# Altium PCB IOT_Speaker.PcbDoc (part 3 of 4)
Units mm, origin at the board's own origin, x right, y up, seen from the top; angles counter-clockwise.
Board outline 89.7 x 68.14 mm, 2 copper layers (Top Layer, Bottom Layer), stack 1.448 mm thick; 210 components, 131 nets, 623 pads, 336 vias.
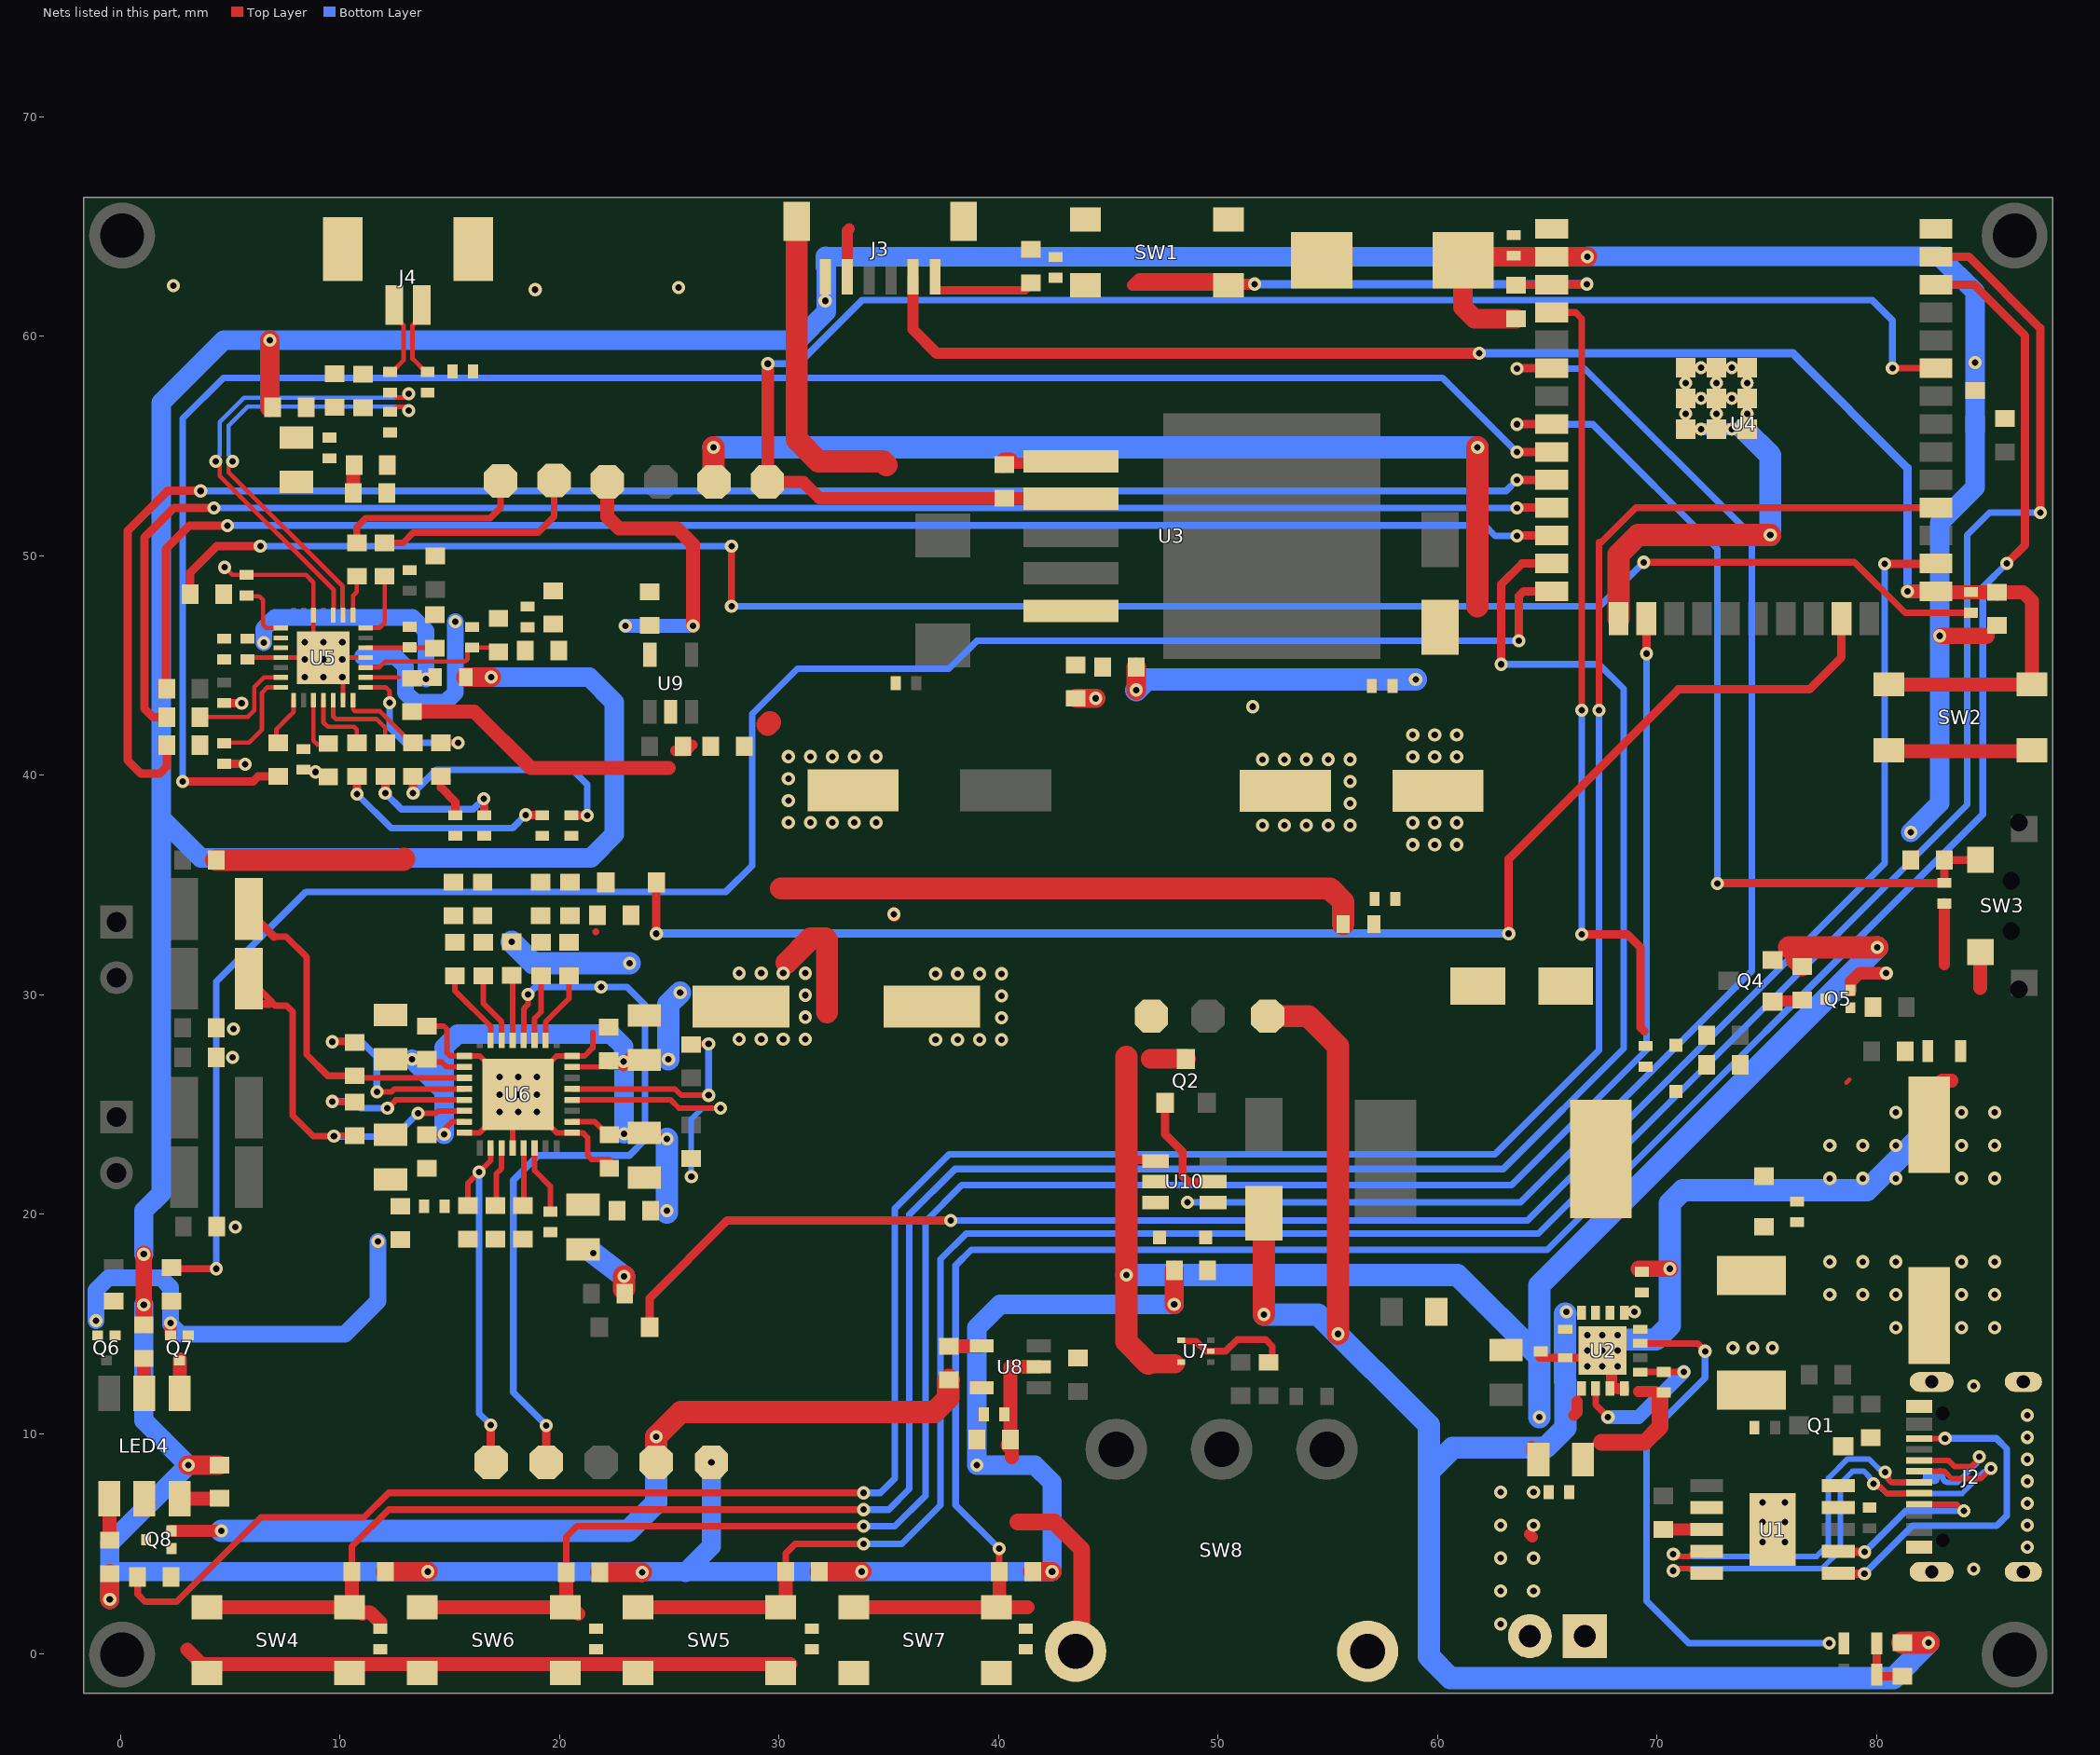
[diagram p2: the nets of this part, all layers, seen from the top]

## Part data (continued)
R38 R39 R40 R41 R55: library part RC0603JR-070RL, "RES 0 OHM JUMPER 1/10W 0603", Case Code (Imperial)=0603, Case Code (Metric)=1608, Manufacturer=Yageo, Max Operating Temperature=155°C, Max Power Dissipation=100mW, Min Operating Temperature=-55°C, Package Quantity=5000, Resistance=0mR, Resistance Tolerance=5%, Resistor Type="Thick Film", Supplier Part Number 1=311-0.0GRCT-ND, Temperature Coefficient=200ppm/°C, Tolerance=1%, Voltage Rating=50V, Case/Package=0603, Category="Chip SMD Resistors", Construction=Rectangular, Contact Plating=Tin,Matte, Depth=0.8mm, Features="Moisture Resistant", Height=0.45mm, Lead Free="Lead Free", Length=1.6mm, Manufacturer Part Number=RC0603JR-070RL, Military Standard=Not, Number of Pins=2, Number of Terminations=2, Packaging="Tape and Reel", Power Rating=100mW, Pricing 1="1=0.10000, 10=0.01700, 25=0.01240, 50=0.00960, 100=0.00700, 250=0.00536, 500=0.00430, 1000=0.00316 (USD)", Radiation Hardening=No, Reach SVHC Compliant="No SVHC", RoHS=Yes, RoHS Compliant=Yes, Series=RC, Size Code=0603, Stock 1=18081776, Supplier 1=Digi-Key, Technology="THICK FILM", Termination=SMD/SMT, Voltage Rating (DC)=50V, Width=0.8mm
R43 R45: library part RC0603FR-072K2L, "RES 2.2K OHM 1% 1/10W 0603", Case Code (Imperial)=0603, Case Code (Metric)=1608, LCSC Part Number=C114662, Manufacturer=Yageo, Max Operating Temperature=155°C, Max Power Dissipation=100mW, Min Operating Temperature=-55°C, Package Quantity=1, Resistance=2.2kR, Resistance Tolerance=1%, Resistor Type="Thick Film", Temperature Coefficient=100ppm/°C, Voltage Rating=50V, Case/Package=0603, Category="Chip SMD Resistors", Construction=Rectangular, Depth=0.8mm, Features="Moisture Resistant", Height=0.022inch, Item Type=Resistor, Lead Free="Lead Free", Length=1.6mm, Manufacturer Part Number=RC0603FR-072K2L, Military Standard=Not, Number of Terminations=2, Packaging="Tape and Reel", Power Rating=100mW, Pricing 1="5000=0.00133, 10000=0.00131, 20000=0.00127 (USD)", RoHS=Yes, RoHS Compliant=Yes, Series=RC, Size Code=0603, Stock 1=733100, Supplier 1=Avnet, Supplier Part Number 1=RC0603FR-072K2L, Termination=SMD/SMT, Tolerance=1%, Width=0.031inch
R44 R52: library part RC0603FR-0710RL, "RES SMD 10 OHM 1% 1/10W 0603", Case Code (Imperial)=0603, Case Code (Metric)=1608, LCSC Part Number=C109318, Manufacturer=Yageo, Max Operating Temperature=155°C, Min Operating Temperature=-55°C, Power Rating=100mW, Supplier Part Number 1=311-10.0HRDKR-ND, Temperature Coefficient=200ppm/°C, Tolerance=1%, Voltage Rating=50V, Case/Package=0603, ComponentLink1Description=http://www.farnell.com/datasheets/1868787.pdf?src-supplier=Element14, ComponentLink1URL=http://www.farnell.com/datasheets/1868787.pdf?src-supplier=Element14, ComponentLink2Description=http://www.yageo.com/documents/recent/PYu-RC0603_51_RoHS_L_4.pdf?src-supplier=Avnet, ComponentLink2URL=http://www.yageo.com/documents/recent/PYu-RC0603_51_RoHS_L_4.pdf?src-supplier=Avnet, ComponentLink3Description=http://documents.rs-components.com/techlib://itc_doclist_GB.htm?stockno=5048984&src-supplier=RSComponents, ComponentLink3URL=http://documents.rs-components.com/techlib://itc_doclist_GB.htm?stockno=5048984&src-supplier=RSComponents, ComponentLink4Description=http://www.yageo.com/documents/recent/PYu-RC0603_51_RoHS_L_4.pdf?src-supplier=Avnet+Europe, ComponentLink4URL=http://www.yageo.com/documents/recent/PYu-RC0603_51_RoHS_L_4.pdf?src-supplier=Avnet+Europe, Composition="Thick Film", Contact Plating=Tin,Matte, Depth=0.8mm, Height=0.45mm, Lead Free="Lead Free", Length=1.6mm, Manufacturer Part Number=RC0603FR-0710RL, Military Standard=Not, Number of Pins=2, Packaging="Tape and Reel", Pricing 1="1=0.1, 10=0.046, 100=0.0187, 1000=0.0084, 2500=0.00729 (USD)", Radiation Hardening=No, REACH SVHC="No SVHC", Resistance=10R, Stock 1=10836596, Supplier 1=Digi-Key, Termination=SMD/SMT, Voltage Rating (DC)=50V, Width=0.8mm
  R52: Item Type=Resistor
R48 R49 R50 R51: library part RC0603FR-075K1L, "RES 5.1K OHM 1% 1/10W 0603", Case Code (Imperial)=0603, Case Code (Metric)=1608, LCSC Part Number=C105580, Manufacturer=Yageo, Max Operating Temperature=155°C, Max Power Dissipation=100mW, Min Operating Temperature=-55°C, Package Quantity=1, Resistance=5.1kR, Resistance Tolerance=1%, Resistor Type="Thick Film", Temperature Coefficient=100ppm/°C, Voltage Rating=50V, Case/Package=0603, Category="Chip SMD Resistors", ComponentLink1Description=https://datasheet.ciiva.com/46395/443971-46395016.pdf?src-supplier=Element14, ComponentLink1URL=https://datasheet.ciiva.com/46395/443971-46395016.pdf?src-supplier=Element14, ComponentLink2Description=https://datasheet.ciiva.com/2454/pyu-r-int-thick-7-2454046.pdf?src-supplier=Digi-Key, ComponentLink2URL=https://datasheet.ciiva.com/2454/pyu-r-int-thick-7-2454046.pdf?src-supplier=Digi-Key, ComponentLink3Description=https://datasheet.ciiva.com/2454/pyu-r-int-thick-7-2454047.pdf?src-supplier=Digi-Key, ComponentLink3URL=https://datasheet.ciiva.com/2454/pyu-r-int-thick-7-2454047.pdf?src-supplier=Digi-Key, ComponentLink4Description=https://datasheet.ciiva.com/2454/pyu-r-int-thick-7-2454045.pdf?src-supplier=Digi-Key, ComponentLink4URL=https://datasheet.ciiva.com/2454/pyu-r-int-thick-7-2454045.pdf?src-supplier=Digi-Key, ComponentLink5Description=https://datasheet.ciiva.com/15189/getdatasheetpartid-326732-15189786.pdf?src-supplier=Verical, ComponentLink5URL=https://datasheet.ciiva.com/15189/getdatasheetpartid-326732-15189786.pdf?src-supplier=Verical, Construction=Rectangular, Depth=0.8mm, Features="Moisture Resistant", Height=0.022inch, Item Type=Resistor, Lead Free="Lead Free", Length=0.063inch, Manufacturer Part Number=RC0603FR-075K1L, Military Standard=Not, Number of Pins=2, Number of Terminations=2, Packaging="Tape and Reel", Power Rating=100mW, Pricing 1="5000=0.00133, 10000=0.00131, 20000=0.00127 (USD)", Reach SVHC Compliant=Yes, RoHS=Yes, RoHS Compliant=Yes, Series=RC, Size Code=0603, Stock 1=100000, Supplier 1=Avnet, Supplier Part Number 1=RC0603FR-075K1L, Termination=SMD/SMT, Tolerance=1%, Voltage Rating (DC)=50V, Width=0.031inch
R53: library part RC0603FR-0773K2L, "RES 73.2K OHM 1% 1/10W 0603", Case Code (Imperial)=0603, Case Code (Metric)=1608, LCSC Part Number=C163420, Manufacturer=Yageo, Max Operating Temperature=155°C, Max Power Dissipation=100mW, Min Operating Temperature=-55°C, Resistor Type="Thick Film", Supplier Part Number 1=8036170, Temperature Coefficient=100ppm/°C, Tolerance=1%, Voltage Rating=50V, Case/Package=0603, Category="Chip SMD Resistors", ComponentLink1Description=https://datasheet.ciiva.com/8888/pyu-rc0603-51-rohs-l-4-8888325.pdf?src-supplier=Avnet, ComponentLink1URL=https://datasheet.ciiva.com/8888/pyu-rc0603-51-rohs-l-4-8888325.pdf?src-supplier=Avnet, Construction=Rectangular, Contact Plating=Tin,Matte, Depth=0.8mm, Features="Moisture Resistant", Height=0.45mm, Item Type=Resistor, Lead Free="Lead Free", Length=1.6mm, Manufacturer Part Number=RC0603FR-0773K2L, Military Standard=Not, Number of Terminations=2, Packaging="Tape and Reel", Power Rating=100mW, Pricing 1="5000=0.00150, 75000=0.00140, 250000=0.00130, 750000=0.00130, 2500000=0.00120 (USD)", RoHS=Yes, RoHS Compliant=Yes, Series=RC, Stock 1=410000, Supplier 1="Future Electronics", Termination=SMD/SMT, Voltage Rating (DC)=50V, Width=0.8mm
SB1 SB2 SB3 SB6 SB7 SB8 SB9 SB10: "Solder Bridge ON", Item Type="Solder Bridge", Manufacturer Part Number="Solder Bridge 0402"
SB4 SB5: "Solder Bridge ON", Manufacturer Part Number="Solder Bridge", Item Type="Solder Bridge"
SW1 SW2: "No NO 50mA 4.5mm 100000 260gf 12V -30℃~+85℃ 4.5mm 4.3mm Black Round Button Brick nogging SPST SMD Tactile Switches ROHS", LCSC Part Number=C381037, Manufacturer="XKB Connectivity", Package=Custom, ComponentLink1Description=LCSC, ComponentLink1URL=https://www.lcsc.com/product-detail/Tactile-Switches_XKB-Connectivity-TS-1109S-C-B_C381037.html, Item Type=Switch, Manufacturer Part Number=TS-1109S-C-B
SW3: "-20℃~+85℃ SMDSplicing Black Rectangle button 50mA Surface Mount SPST 100MΩ 100000 250gf@±50gf 12V SMD Tactile Switches ROHS", LCSC Part Number=C589180, Manufacturer="RI SHENG", ComponentLink1Description=LCSC, ComponentLink1URL=https://www.lcsc.com/product-detail/Tactile-Switches_RI-SHENG-ST-1112RA-P_C589180.html, Manufacturer Part Number=ST-1112RA-P
SW4 SW5 SW6 SW7: "No NO 50mA 4.5mm 100000 160gf 12V -30℃~+85℃ 4.5mm 8mm Black Round Button Brick nogging SPST SMD Tactile Switches ROHS", LCSC Part Number=C480323, Manufacturer="XKB Connectivity", Package=SMD, ComponentLink1Description=LCSC, ComponentLink1URL=https://www.lcsc.com/product-detail/span-style-background-color-ff0-Tactile-span-Switches_XKB-Connectivity-TS-1109S-B-J_C480323.html, Item Type=Switch, Manufacturer Part Number=TS-1109S-B-J
SW8: "Lying 3A SPDT 125V 6.3mm 13.5mm 125V 6.6mm 3A PCPin 10000 Rectangular columnar -40℃~+85℃ Black Plugin Slide Switches ROHS", LCSC Part Number=C319010, Manufacturer="XKB Connectivity", Package=Plugin, ComponentLink1Description="LCSC Part Number", ComponentLink1URL=https://www.lcsc.com/product-detail/Slide-Switches_XKB-Connectivity-SS-12D11L5_C319010.html, Item Type=Switch, Manufacturer Part Number=SS-12D11L5
U1: "USB充电芯片 ESSOP-10 USB ICs ROHS", LCSC Part Number=C970725, Manufacturer="WCH(Jiangsu Qin Heng)", Package=ESSOP-10, ComponentLink1Description=LCSC, ComponentLink1URL=https://www.lcsc.com/product-detail/USB-ICs_WCH-Jiangsu-Qin-Heng-CH224K_C970725.html, Item Type=IC, Manufacturer Part Number=CH224K
U2: "TQFN-16-EP(4x4) Battery Management ICs ROHS", LCSC Part Number=C379389, Manufacturer="TOPPOWER(Nanjing Extension Microelectronics)", Package=TQFN-16-EP(4x4), ComponentLink1Description=LCSC, ComponentLink1URL=https://www.lcsc.com/product-detail/Battery-Management-ICs_TOPPOWER-Nanjing-Extension-Microelectronics-TP5100_C379389.html, Item Type=IC, Manufacturer Part Number=TP5100
U3: "NO boost converterType 1 Boost 60V 5V~40V 5A 220kHz TO-263-5 DC-DC Converters ROHS", Manufacturer=XLSEMI, Manufacturer Part Number=C73018, Package=TO-263-5, ComponentLink1Description=LCSC, ComponentLink1URL=https://www.lcsc.com/product-detail/DC-DC-Converters_XLSEMI-XL6019E1_C73018.html, Item Type=Converter, LCSC Part Number=XL6019E1
U4: "SMD,18x25.5mm WiFi Modules ROHS", LCSC Part Number=C701342, Manufacturer="Espressif Systems", Supplier Part Number 1=356-ESP32WRM32E164PH, Category=Uncategorized, ComponentLink1Description=LCSC, ComponentLink1URL=https://www.lcsc.com/product-detail/WiFi-Modules_Espressif-Systems-ESP32-WROOM-32E-N8_C701342.html, Item Type=Module, Manufacturer Part Number=ESP32-WROOM-32E-N8, Pricing 1="1=3.30000, 10=3.30000, 50=3.30000, 100=3.30000, 1000=3.30000, 10000=3.30000 (USD)", RoHS=No, Stock 1=24616, Supplier 1=Mouser
U5: "QFN-28-EP(4x4) ADC/DAC - Specialized ROHS", LCSC Part Number=C365736, Manufacturer=Everest-semi, Package=QFN-28-EP(4x4), ComponentLink1Description=LCSC, ComponentLink1URL=https://www.lcsc.com/product-detail/ADC-DAC-Specialized_Everest-semi-Everest-Semiconductor-ES8388_C365736.html, Item Type=IC, Manufacturer Part Number=ES8388
U6: "IC AMP AUDIO 15W CLASS D 32UQFN", Case/Package=QFN, LCSC Part Number=C167118, Manufacturer=Diodes, Max Operating Temperature=85°C, Max Output Power=10W, Max Supply Voltage=18V, Min Operating Temperature=-20°C, Min Supply Voltage=8V, Package Quantity=3000, Power Supply Rejection Ratio (PSRR)=65dB, Supplier Part Number 1=7902950, Voltage Gain=32dB, Category="Amplifiers - Audio", ComponentLink1Description=https://datasheet.ciiva.com/24013/pam8006a-247273-24013164.pdf?src-supplier=Mouser, ComponentLink1URL=https://datasheet.ciiva.com/24013/pam8006a-247273-24013164.pdf?src-supplier=Mouser, ComponentLink2Description=https://datasheet.ciiva.com/29896/pam8006a-29896322.pdf?src-supplier=Avnet, ComponentLink2URL=https://datasheet.ciiva.com/29896/pam8006a-29896322.pdf?src-supplier=Avnet, ComponentLink3Description=https://datasheet.ciiva.com/30481/0900766b81268cf3-30481630.pdf?src-supplier=Rs, ComponentLink3URL=https://datasheet.ciiva.com/30481/0900766b81268cf3-30481630.pdf?src-supplier=Rs, Height=0.75mm, Item Type=IC, Lead Free="Lead Free", Length=5mm, Manufacturer Part Number=PAM8006ATR, Mounting Technology="Surface Mount", Packaging="Tape and Reel", Pins=32, Pricing 1="2=2.11500 (GBP)", Radiation Hardening=No, RoHS=Yes, RoHS Compliant=Yes, Series=-, Stock 1=596, Supplier 1=Rs, Width=5mm
U7: "IC SUPERVISOR 1 CHANNEL 5VSOF", Case/Package=VSOF, LCSC Part Number=C509824, Manufacturer=Rohm, Max Operating Temperature=105°C, Max Power Dissipation=210mW, Max Reset Threshold Voltage=6.09V, Max Supply Current=1.98uA, Max Supply Voltage=10V, Min Operating Temperature=-40°C, Min Reset Threshold Voltage=5.91V, Min Supply Voltage=1.2V, Number of Voltages Monitored=1, Operating Supply Current=900nA, Package Quantity=3000, Supplier Part Number 1=BD4860FVE-CT-ND, Threshold Voltage=6V, Accuracy=1%, Category="Voltage Supervisors", ComponentLink1Description=https://datasheet.ciiva.com/1974/bd48xxg-e-1974994.pdf?src-supplier=Digi-Key, ComponentLink1URL=https://datasheet.ciiva.com/1974/bd48xxg-e-1974994.pdf?src-supplier=Digi-Key, ComponentLink2Description=https://datasheet.ciiva.com/8133/bd48xxg-e-8133113.pdf?src-supplier=Avnet, ComponentLink2URL=https://datasheet.ciiva.com/8133/bd48xxg-e-8133113.pdf?src-supplier=Avnet, Item Type=IC, Lead Free="Lead Free", Manufacturer Part Number=BD4860FVE-TR, Mounting Technology="Surface Mount", Number of Monitored Inputs=1, Packaging="Tape and Reel", Pins=5, Pricing 1="1=0.64000, 10=0.54900, 25=0.51200, 100=0.40960, 250=0.38032, 500=0.32182, 1000=0.24868 (USD)", Reset="Active Low", RoHS=Yes, RoHS Compliant=Yes, Series=BD48xxx, Stock 1=5990, Supplier 1=Digi-Key, Type="Simple Reset/Power-On Reset,Voltage Detector", Watchdog Timer=No
U8: "SPX3819 Series 3.3 V 500 mA Fixed Output SMT LDO Regulator - SOT-23-5", LCSC Part Number=C9055, Manufacturer=MaxLinear, Supplier Part Number 1=23R9703, Category="Voltage Regulators - Linear", ComponentLink1Description=LCSC, ComponentLink1URL=https://www.lcsc.com/product-detail/Linear-Voltage-Regulators-LDO_MaxLinear-SPX3819M5-L-3-3-TR_C9055.html, Item Type=IC, Manufacturer Part Number=SPX3819M5-L-3-3/TR, RoHS=Yes, RoHS Compliant=Yes, Supplier 1=Newark
U9: "IC REG LINEAR 3.3V 150MA SOT23-5", LCSC Part Number=C89347, Manufacturer="Texas Instruments", Package=SOT-23-5, Item Type=IC, Manufacturer Part Number=TPS70933DBVR
U10: "IC OR CTRLR SRC SELECT TSOT23-6", Case/Package=SOT-23-6, LCSC Part Number=C521306, Manufacturer="Analog Devices / Linear Technology", Max Operating Temperature=85°C, Min Operating Temperature=-40°C, Operating Supply Current=15uA, Package Quantity=2500, Supplier Part Number 1=LTC4412IS6#TRPBFCT-ND, Category=Uncategorized, ComponentLink1Description=https://datasheet.ciiva.com/1960/1527-1960891.pdf?src-supplier=Digi-Key, ComponentLink1URL=https://datasheet.ciiva.com/1960/1527-1960891.pdf?src-supplier=Digi-Key, Item Type=IC, Length=2.9mm, Manufacturer Part Number=LTC4412IS6#TRPBF, Number of Pins=6, Packaging="Tape and Reel", Pricing 1="1=3.90000, 10=3.50700, 25=3.31520, 100=2.87310, 250=2.72580, 500=2.44584, 1000=2.08500 (USD)", RoHS=Yes, RoHS Compliant=Yes, Series=PowerPath™, Stock 1=2608, Supplier 1=Digi-Key, Turn-Off Delay Time=13us, Turn-On Delay Time=110us

## Free pads (board coordinates)
  round 3 hole 2: MH(0.076,-0.051) MH(0.076,64.592) MH(86.284,-0.051) MH(86.284,64.592)

## Via types
v1: diameter 0.6, hole 0.3, Top Layer to Bottom Layer, 183 vias
v2: diameter 0.6, hole 0.3, Top Layer to Bottom Layer, tented both sides, 153 vias

## Nets (pads, with @x,y where several pads share a name; then routed paths per layer and width w, separated by ;. In a path a pad name is that pad's centre, name@x,y a point inside that pad or via, vN(x,y) a via of type N, cw(c..) or ccw(c..) an arc to the next point about the centre after c; other vN are vias at no path point)
3.3V: C16.1 C17.1 C76.1 C77.1 FB2.1 J3.1 P13.1 R1.2 R17.2 R18.1 R20.1 R24.2 R25.2 R26.2 R27.2 R28.2 R29.2 R30.2 R31.2 R32.2 R42.1 U4.2 U8.5 | length 305.1
  Top Layer w0.381: v2(82.88,46.355) 82.899,46.355 v2@82.939,46.355
  Top Layer w0.559: R18.1@85.319,46.682 85.319,46.723 85.42,46.825 R18.1@85.484,46.825
  Top Layer w0.762: R32.2@1.067,14.961 v2(1.067,15.875) v2(1.067,18.186) ; v2@82.939,46.355 84.991,46.355
  Top Layer w0.889: v2(-0.483,2.457) R30.2@-0.483,3.632 ; v2(3.099,8.585) R31.2@4.521,8.585 ; R42.1@6.807,56.769 v2(6.807,59.833) ; R24.2@12.072,3.727 v2(14.002,3.727) ; FB2.1@15.737,44.475 v2(16.891,44.475) ; R25.2@21.84,3.702 v2(23.771,3.702) ; R26.2@31.837,3.727 v2(33.767,3.727) ; R27.2@41.554,3.727 v2(42.443,3.727) ; v2(48.006,15.9) R1.2@48.006,17.45 ; C16.1@61.366,63.678 C16.1@61.163,63.475 61.163,61.328 61.684,60.808 ; C16.1@61.57,63.627 63.475,63.627 v2(66.827,63.627) ; 61.684,60.795 R17.2@63.576,60.795
  Bottom Layer w0.889: v2(-0.483,2.457) -0.483,3.727 ; v2(1.067,15.875) 1.067,10.617 v2(3.099,8.585) -0.483,5.004 -0.483,3.727 ; v2(1.067,18.186) 1.067,20.168 1.854,20.955 1.854,38.049 ; v2(16.891,44.475) 21.361,44.475 22.504,43.332 22.504,37.313 21.438,36.246 3.658,36.246 1.854,38.049 ; v2(23.771,3.702) v2@23.771,3.727 ; 25.749,3.702 26.924,4.877 v2(26.924,8.712) ; 32.118,63.17 32.118,63.64 32.131,63.652 32.131,63.64 32.144,63.627 v2(66.827,63.627) 66.853,63.652 82.855,63.652 84.48,62.027 v2(84.48,58.801) 84.48,53.111 82.88,51.511 v2(82.88,46.355) 82.88,38.735 v2(81.559,37.414) ; 32.156,63.17 32.156,61.112 30.877,59.833 v2(6.807,59.833) 4.715,59.833 1.854,56.972 1.854,38.049 ; v2(48.006,15.9) 40.081,15.9 39.014,14.834 v2(39.014,8.585) 41.656,8.585 42.443,7.798 v2(42.443,3.727) v2(33.767,3.727) 25.749,3.727 v2@23.771,3.727 ; -0.483,3.727 v2(14.002,3.727) v2@23.771,3.727
  other v2: 32.106,61.62
3.3V##: C28.2 C29.2 C30.2 FB2.2 U5.2 U5.3 U5.16 | length 12.2
  Top Layer w0.203: U5.16@11.179,44.464 12.686,44.464
  Bottom Layer w0.762: v2(6.528,46.05) 6.528,46.685 7.036,47.193 13.31,47.193 13.919,46.584 v2(13.919,44.399)
12V: C3.1 C7.1 C8.1 D2.1 D8.2 F1.2 P1.1 R3.2 U2.1 U2.4 U2.5 U2.16 | length 79
  Top Layer w0.381: D8.2@52.07,20.028 D8.2@52.095,20.054
  Top Layer w1.016: D8.2@52.07,20.028 52.095,20.003 v1(52.095,15.443) ; P1.1@52.267,29.032 54.102,29.032 55.474,27.661 v1(55.474,14.554) ; R3.2@81.178,0.483 v2(82.372,0.483)
  Bottom Layer w0.635: v1@65.822,15.479 v1@65.862,15.519
  Bottom Layer w1.016: v1(52.095,15.443) 54.559,15.443 59.599,10.404 59.599,8.28 ; v1@65.822,15.479 65.811,15.469 65.811,12.401 65.822,12.391 65.822,10.272 64.922,9.373 60.691,9.373 59.599,8.28 ; v2(82.372,0.483) 80.772,-1.118 60.579,-1.118 59.599,-0.137 59.599,8.28
  other v1: 80.872,14.843 83.872,14.843 85.372,14.843 65.862,15.57 68.969,15.57 77.872,16.343 79.372,16.343 80.872,16.343 83.872,16.343 85.372,16.343 77.872,17.843 79.372,17.843 80.872,17.843 83.872,17.843 85.372,17.843
12V#: F1.1 SB1.2
  other v1: 73.457,13.919 74.358,13.919 75.26,13.919
AGND: C23.2 C24.2 C25.2 C26.2 C27.2 C28.1 C29.1 C30.1 C31.2 C32.2 C33.1 C34.1 C37.1 C38.1 C39.2 C40.2 C42.1 C44.1 C45.2 C46.2 C78.2 C79.2 J4.MP1 J4.MP2 R45.2 R55.1 SB5.1 U5.4 U5.13 U5.18 U5.26 U5.29 U9.2 | length 40.9
  Top Layer w0.203: v2(4.75,49.479) 5.093,49.136 C25.2@5.74,49.136 8.446,49.136 8.796,48.786 U5.26@8.796,47.297 U5.29@8.796,45.364 ; C29.1@5.791,45.364 U5.4@7.313,45.364 U5.29@8.796,45.364 ; U5.13@10.146,43.431 U5.29@10.146,45.364 ; U5.18@11.179,45.364 U5.29@10.146,45.364 ; U5.29@8.796,45.364 U5.29@9.246,45.364 10.109,45.364 U5.29@10.146,45.364
  Top Layer w0.381: C27.2@4.724,40.526 4.731,40.519 5.683,40.519 v2(5.69,40.513) ; C26.2@4.724,43.294 v1(5.524,43.294)
  Top Layer w0.508: C78.2@25.298,41.119 25.301,41.122 25.769,41.122 26.034,41.388
  Top Layer w0.635: C44.1@10.617,52.857 10.617,54.102 R45.2@10.643,54.127 ; C28.1@13.284,42.901 16.129,42.901 18.694,40.335 24.982,40.335
  Bottom Layer w0.762: 11.024,45.415 12.533,45.415 12.979,44.969 12.979,43.779 13.426,43.332 14.819,43.332 15.265,43.779 v2(15.265,47.003)
  other v1: 8.89,40.157 8.407,44.475 9.258,44.475 10.109,44.475 8.407,45.275 9.258,45.275 10.109,45.275 8.407,46.076 9.258,46.076 10.109,46.076
  other v2: 18.898,62.128 25.425,62.23 2.413,62.306
AVCC: C61.1 C62.1 R52.2 U6.22 | length 2.9
  Top Layer w0.254: U6.22@18.869,23.019 18.869,21.999 19.583,21.285 19.583,20.396
AVDD: C60.1 U6.5 | length 2.9
  Top Layer w0.254: U6.5@17.869,27.919 C60.1@17.869,30.847
B_EN: R23.2 U4.28 | length 123.9
  Top Layer w0.305: R23.2@0.787,3.48 0.787,2.692 1.118,2.362 2.565,2.362 6.401,6.198 11.1,6.198 12.217,7.315 v2@33.655,7.315 ; v2(67.361,42.977) 67.361,50.622 ; 67.462,50.622 69.037,52.197 U4.28@82.702,52.197
  Bottom Layer w0.305: v2(33.858,7.315) 34.62,7.315 35.281,7.976 35.281,20.264 37.75,22.733 62.612,22.733 67.361,27.482 v2(67.361,42.977)
BAT_ADC: C9.2 D4.2 R10.1 R11.1 U4.4 | length 36.3
  Top Layer w0.305: U4.4@65.202,61.087 66.294,61.087 66.573,60.808 v2(66.573,42.977)
  Top Layer w0.381: v2(66.573,32.766) 68.631,32.766 69.253,32.144 69.253,28.511 69.418,28.346
  Bottom Layer w0.305: v2(66.573,32.766) v2(66.573,42.977)
BATT: C1.1 C2.1 J1.2 P2.1 Q2.3 Q4.2 R9.2 R12.2 U2.9 U7.5 U10.1 | length 72.2
  Top Layer w0.381: 45.999,22.697 46.223,22.474 47.118,22.474 U10.1@47.153,22.438
  Top Layer w0.508: 64.195,5.426 64.313,5.309 ; C1.1@64.287,9.169 C1.1@64.287,9.423 ; 66.218,10.846 66.358,10.986 66.358,11.493
  Top Layer w0.889: 46.825,13.195 48.044,13.195 ; 46.923,27.086 Q2.3@48.539,27.086 ; R12.2@76.307,31.593 R12.2@76.606,31.293
  Top Layer w1.016: 45.822,27.178 v1(45.822,17.247) 45.822,14.199 46.825,13.195 ; 76.022,32.156 v1(80.035,32.156)
  Bottom Layer w1.016: v1(45.822,17.247) 60.909,17.247 64.643,13.513 ; v1(64.643,10.77) 64.643,13.513 ; v1(80.035,32.156) 64.643,16.764 64.643,13.513
  other v1: 62.872,1.343 62.872,2.843 64.372,2.843 62.872,4.343 64.372,4.343 62.872,5.843 64.372,5.843 62.872,7.343 64.372,7.343
BLUE: LED4.2 Q8.3 | length 0.3
  Top Layer w0.635: LED4.2@1.092,7.049 LED4.2@1.275,6.866
BOOST12V_EN: P6.1 R13.2 U3.2 U4.33 | length 76.1
  Top Layer w0.305: v2(80.721,58.547) U4.33@82.702,58.547
  Top Layer w0.381: P6.1@29.472,53.365 P6.1@29.494,53.387
  Top Layer w0.559: P6.1@29.472,53.365 31.115,53.365 31.852,52.629 R13.2@40.259,52.629 ; P6.1@29.494,53.387 v2(29.494,58.754) ; R13.2@40.273,52.615 R13.2@40.259,52.629 ; U3.2@42.875,52.629 R13.2@40.259,52.629 ; U3.2@43.293,52.615 U3.2@43.306,52.602
  Bottom Layer w0.305: v2(29.494,58.754) 30.891,58.754 33.782,61.646 79.807,61.646 80.721,60.731 v2(80.721,58.547)
BOOST_12V: C50.1 C51.1 C52.1 C53.1 C59.1 C66.1 C67.1 C68.1 C69.1 FB1.1 R52.1 U6.10 U6.15 U6.26 U6.31 | length 70.7
  Top Layer w0.254: C50.1@12.308,27.061 v1(13.292,27.061) C51.1@13.959,27.061 14.076,26.944 14.636,26.944 14.861,26.719 U6.10@15.669,26.719 ; v1(14.757,23.647) 14.732,23.622 C53.1@13.959,23.622 13.949,23.622 13.959,23.632 14.513,23.632 15.1,24.219 U6.15@15.669,24.219 ; U6.26@20.569,24.219 21.615,24.219 22.162,23.673 v1(22.936,23.673) ; U6.31@20.569,26.719 22.213,26.719 C69.1@22.25,26.756 ; C69.1@22.259,26.714 v1@22.919,26.714
  Top Layer w0.381: v1@22.919,26.714 v1@23.012,26.807 ; C66.1@23.932,23.602 24.047,23.486 24.85,23.486 v2(24.892,23.444) ; v1@24.943,27.076 v1(24.968,27.076)
  Top Layer w0.762: C68.1@23.216,27.01 C68.1@23.865,27.01
  Top Layer w1.016: 30.099,34.849 55.094,34.849 55.699,34.244 FB1.1@55.699,33.223 ; 30.353,31.471 31.461,32.579 32.122,32.579 ; 32.188,29.217 32.188,32.512
  Bottom Layer w0.889: v1(13.292,27.061) 14.757,25.596 ; v1(14.757,23.647) 14.757,25.596 ; v1(22.936,23.673) 22.936,26.951 v1(22.919,26.968) 22.919,27.652 22.352,28.219 15.367,28.219 14.757,27.61 14.757,25.596
  Bottom Layer w1.016: v2@24.892,20.091 v2(24.892,23.444) ; v1(24.968,27.076) 24.968,29.566 v1(25.502,30.099)
  other v1: 28.194,27.988 29.194,27.988 30.194,27.988 31.194,27.988 31.194,28.988 31.194,29.988 28.194,30.988 29.194,30.988 30.194,30.988 31.194,30.988
  other v2: 24.892,20.168
BOOST_12V#: C10.1 C12.1 D5.1 P5.1 R14.1 SB2.1 | length 57.7
  Top Layer w0.635: P5.1@27.026,53.382 P5.1@27.043,53.365 ; 61.824,47.701 61.874,47.65
  Top Layer w0.889: v1(46.279,43.891) R14.1@46.279,44.933
  Top Layer w1.016: P5.1@27.026,53.382 v2(27.026,54.94) ; 61.824,47.701 v2(61.824,54.94)
  Bottom Layer w0.635: v2(27.026,54.94) v2@27.043,54.94
  Bottom Layer w1.016: v2(27.026,54.94) v2(61.824,54.94) ; v1(46.279,43.891) 46.761,44.374 v1(59.004,44.374)
  other v1: 58.872,36.843 59.872,36.843 60.872,36.843 58.872,37.843 59.872,37.843 60.872,37.843 58.872,40.843 59.872,40.843 60.872,40.843 58.872,41.843 59.872,41.843 60.872,41.843
BSLN: C47.2 U6.12 | length 9
  Top Layer w0.254: C47.2@10.643,27.864 C47.2@10.668,27.838 ; v2(11.684,25.578) 12.351,25.578 12.492,25.719 U6.12@15.669,25.719
  Top Layer w0.305: v2(9.652,27.864) C47.2@10.643,27.864
  Bottom Layer w0.305: v2(9.652,27.864) 9.677,27.889 10.973,27.889 11.684,27.178 v2(11.684,25.578)
BSLP: C49.2 U6.13 | length 7.3
  Top Layer w0.254: v2(12.167,24.841) 12.544,25.219 U6.13@15.669,25.219
  Top Layer w0.305: v2(9.652,25.146) 9.665,25.133 C49.2@10.655,25.133
  Top Layer w0.381: C49.2@10.655,25.133 C49.2@10.668,25.121
  Bottom Layer w0.305: v2(9.652,25.146) 10.643,25.146 10.947,24.841 v2(12.167,24.841)
BSRN: C70.2 U6.29 | length 9.5
  Top Layer w0.254: U6.29@20.569,25.719 25.259,25.719 25.552,25.425 v2(26.797,25.425)
  Top Layer w0.305: C70.2@26.022,27.775 v2@26.784,27.775
  Top Layer w0.381: C70.2@26.01,27.788 C70.2@26.022,27.775 ; v2@26.784,27.775 v2(26.797,27.762)
  Bottom Layer w0.305: v2(26.797,25.425) v2(26.797,27.762)
BSRP: C72.2 U6.28 | length 11.2
  Top Layer w0.254: U6.28@20.569,25.219 25.073,25.219 25.451,24.841 v2(27.33,24.841)
  Bottom Layer w0.254: v2@26.01,21.615 26.01,24.333 26.518,24.841 v2(27.33,24.841)
  other v2: 26.01,21.717
BUTTON_1: C19.1 R24.1 SW4.1 SW4.2 U4.13 | length 114.7
  Top Layer w0.305: R24.1@10.548,3.727 10.548,4.884 12.217,6.553 v2@33.655,6.553
  Top Layer w0.381: v2(62.89,45.06) 62.89,48.692 63.856,49.657 U4.13@65.202,49.657
  Top Layer w0.635: SW4.1@3.938,2.11 SW4.2@10.438,2.11 10.671,1.877 SW4.2@10.95,1.877 ; R24.1@10.548,3.727 10.548,2.279 SW4.2@10.95,1.877 ; SW4.2@11.024,1.803 SW4.2@10.95,1.877 ; 11.836,1.416 11.376,1.877 SW4.2@10.95,1.877
  Bottom Layer w0.305: v2(33.858,6.553) 35.001,6.553 35.941,7.493 35.941,19.99 38.023,22.073 62.992,22.073 68.478,27.559 68.478,43.942 67.361,45.06 v2(62.89,45.06)
BUTTON_2: C21.1 R25.1 SW6.1 SW6.2 U4.16 | length 95.4
  Top Layer w0.305: R25.1@20.316,3.702 20.316,5.305 20.803,5.791 v2@33.655,5.791
  Top Layer w0.381: v2@69.512,45.563 U4.16@69.512,47.137
  Top Layer w0.635: SW6.1@13.76,2.11 SW6.2@20.26,2.11 ; R25.1@20.316,3.702 20.316,2.341 SW6.2@20.853,1.803
  Bottom Layer w0.305: v2(33.858,5.791) 35.281,5.791 36.678,7.188 36.678,19.685 38.329,21.336 63.373,21.336 69.525,27.488 v2(69.525,45.55)
BUTTON_3: C20.1 R26.1 SW5.1 SW5.2 U4.37 | length 113.9
  Top Layer w0.305: R26.1@30.313,3.727 30.313,4.557 30.745,4.989 v2@33.655,4.989
  Top Layer w0.381: U4.37@82.702,63.627 84.201,63.627 87.452,60.376 v2(87.452,51.968)
  Top Layer w0.635: SW5.1@23.581,2.11 SW5.2@30.081,2.11 30.313,2.342 R26.1@30.313,3.727
  Bottom Layer w0.305: v2(33.858,4.989) 35.596,4.989 37.363,6.756 37.363,17.958 38.532,19.126 64.592,19.126 84.125,38.659 84.125,50.952 85.141,51.968 v2(87.452,51.968)
BUTTON_4: C22.1 R27.1 SW7.1 SW7.2 U4.36 | length 107.2
  Top Layer w0.305: R27.1@40.03,3.727 v2(40.03,4.775)
  Top Layer w0.381: U4.36@82.702,62.357 84.43,62.357 86.766,60.02 86.766,50.495 v2(85.928,49.657)
  Top Layer w0.635: SW7.1@33.402,2.11 SW7.2@39.902,2.11 ; R27.1@40.043,3.664 40.043,2.251 SW7.2@39.902,2.11 ; 41.337,2.11 SW7.2@39.902,2.11
  Bottom Layer w0.305: v2(40.03,4.775) 38.049,6.756 38.049,17.678 38.76,18.39 64.999,18.39 84.836,38.227 84.836,48.565 v2(85.928,49.657)
CC1: J2.A5 U1.7 | length 8.7
  Top Layer w0.254: J2.A5@81.937,6.796 83.651,6.796 83.944,6.502 v2(83.972,6.502)
  Top Layer w0.381: U1.7@78.263,4.645 78.287,4.621 v2(79.453,4.621)
  Bottom Layer w0.305: v2(79.453,4.621) 81.334,6.502 v2(83.972,6.502)
CC2: J2.B5 U1.6 | length 16
  Top Layer w0.254: J2.B5@81.937,9.796 v2(83.117,9.796)
  Top Layer w0.381: U1.6@78.263,3.645 78.281,3.627 v2(79.447,3.627)
  Bottom Layer w0.305: v2(79.447,3.627) 81.636,5.817 85.471,5.817 85.928,6.274 85.928,9.322 85.454,9.796 v2(83.117,9.796)
CFG3: R4.1 U1.3 | length 2.1
  Top Layer w0.559: R4.1@70.231,5.588 R4.1@70.288,5.645 U1.3@72.263,5.645
CHRG: LED1.2 U2.15 | length 24.7
  Top Layer w0.305: U2.15@69.239,14.121 71.861,14.121 72.187,13.795 v2(72.187,13.767)
  Bottom Layer w0.305: v2(72.187,13.767) 72.187,12.548 69.52,9.881 69.52,2.388 71.441,0.467 v1(77.835,0.467)
CHRG_CHK: D1.2 R1.1 U4.6 U10.4 | length 65.3
  Top Layer w0.381: v2@63.628,58.547 U4.6@65.202,58.547
  Bottom Layer w0.305: v2(48.616,20.549) 63.779,20.549 74.32,31.09 74.32,50.917 66.703,58.534 v2(63.615,58.534)
CODEC_3V3: C45.1 C46.1 C79.1 P14.1 R44.1 U9.5 | length 12.8
  Top Layer w0.635: P14.1@22.183,53.365 22.183,51.782 22.708,51.257 25.349,51.257 26.086,50.521 v2(26.086,46.812)
  Bottom Layer w0.635: v2(23.012,46.812) v2(26.086,46.812)
CODEC_3V3#: C39.1 C40.1 R44.2 U5.17 | length 6.4
  Top Layer w0.203: U5.17@11.179,44.914 11.793,44.914 12.065,45.187 15.692,45.187 15.811,45.306 15.811,45.695 15.918,45.801 16.007,45.801 C40.1@16.027,45.822 C39.1@16.961,45.822
CS_CELL: C4.2 U2.10 U2.13 | length 7.8
  Top Layer w0.305: U2.10@67.205,12.071 67.205,11.332 v2(67.767,10.77) ; U2.13@69.239,12.821 C4.2@70.301,12.821 ; C4.2@70.304,12.825 C4.2@70.304,12.825 71.22,12.826 v2(71.222,12.827)
  Bottom Layer w0.635: v2(67.767,10.77) 69.164,10.77 v2(71.222,12.827)
D_N: J2.A7 J2.B7 U1.5 | length 26.6
  Top Layer w0.254: v2(70.739,3.769) 70.836,3.866 71.491,3.866 71.539,3.818 72.09,3.818 U1.5@72.263,3.645 ; v2(79.859,7.723) 79.953,7.723 80.091,7.585 80.176,7.585 80.471,7.289 81.096,7.289 81.102,7.296 J2.B7@81.937,7.296 ; J2.A7@81.937,8.296 83.093,8.296 83.428,7.961 84.745,7.961 v2(85.217,8.433)
  Bottom Layer w0.254: v2(70.739,3.769) 70.805,3.835 71.03,3.835 71.061,3.866 77.503,3.866 78.359,4.722 78.359,7.747 78.914,8.302 79.416,8.302 79.7,8.019 79.7,7.976 79.859,7.817 v2(79.859,7.723) 79.953,7.723 80.094,7.582 80.173,7.582 80.471,7.284 83.896,7.284 84.903,8.292 84.982,8.292 85.123,8.433 v2(85.217,8.433)
D_P: J2.A6 J2.B6 U1.4 | length 26.6
  Top Layer w0.254: v2(70.739,4.522) 70.836,4.425 71.491,4.425 71.539,4.472 72.09,4.472 U1.4@72.263,4.645 ; v2(80.391,8.255) 80.391,8.161 80.529,8.023 80.529,7.938 80.678,7.789 80.889,7.789 80.895,7.796 J2.A6@81.937,7.796 ; J2.B6@81.937,8.796 83.269,8.796 83.545,8.52 84.334,8.52 84.685,8.871 v2(84.685,8.965)
  Bottom Layer w0.254: v2(70.739,4.522) 70.805,4.455 71.03,4.455 71.061,4.425 77.272,4.425 77.8,4.953 77.8,7.978 78.683,8.861 79.648,8.861 80.095,8.414 80.138,8.414 80.297,8.255 v2(80.391,8.255) 80.391,8.161 80.532,8.02 80.532,7.941 80.681,7.792 81.255,7.792 81.991,7.792 ccw(c81.991,8.046) 82.245,8.046 82.245,8.104 cw(c82.372,8.104) 82.499,8.104 82.499,7.97 ccw(c82.626,7.97) 82.753,7.97 82.753,8.169 cw(c82.88,8.169) 83.007,8.169 83.007,8.046 ccw(c83.261,8.046) 83.261,7.792 83.642,7.792 83.685,7.792 84.544,8.651 84.544,8.73 84.685,8.871 v2(84.685,8.965)
DAC_L+: R40.1 SB8.1 | length 6.5
  Top Layer w0.381: v2(12.065,39.192) R40.1@12.065,39.954 ; v2(16.561,38.938) 16.568,38.931 16.568,38.193 SB8.1@16.575,38.186
  Bottom Layer w0.305: v2(12.065,39.192) 12.802,38.456 16.078,38.456 v2(16.561,38.938)
DAC_L-: R38.1 SB9.1 | length 2.4
  Top Layer w0.381: R38.1@14.859,39.764 14.668,39.954 R38.1@14.605,39.954 14.605,39.446 15.254,38.797 SB9.1@15.254,38.186
DAC_R+: R41.1 SB7.1 | length 10.1
  Top Layer w0.381: v2(10.782,39.154) R41.1@10.782,39.954 ; v2(18.466,38.202) 18.475,38.192 19.211,38.192 SB7.1@19.217,38.186
  Bottom Layer w0.305: v2(10.782,39.154) 12.344,37.592 17.856,37.592 v2(18.466,38.202)
DAC_R-: R39.1 SB6.1 | length 11.6
  Top Layer w0.381: v2(13.335,39.192) R39.1@13.335,39.954 ; SB6.1@20.538,38.186 20.543,38.181 21.255,38.181 v2(21.26,38.176)
  Bottom Layer w0.305: v2(13.335,39.192) 14.402,40.259 20.599,40.259 21.26,39.599 v2(21.26,38.176)
DACVREF: C31.1 C32.1 U5.19 | length 3.2
  Top Layer w0.203: U5.19@11.179,45.814 13.163,45.814 C32.1@13.183,45.834 13.203,45.814 C31.1@14.326,45.814
EN: C14.2 C15.2 J3.6 R17.1 SW1.3 SW1.4 U4.3 | length 33.1
  Top Layer w0.381: J3.6@37.111,62.161 37.169,62.103 41.212,62.103 41.478,62.37 C14.2@41.478,62.433 ; R17.1@63.576,62.332 63.589,62.344 65.19,62.344 U4.3@65.215,62.37 ; U4.3@65.228,62.382 v2(66.802,62.382)
  Top Layer w0.508: SW1.4@50.469,62.332 46.114,62.332 46.419,62.636 50.469,62.636 50.74,62.365 51.646,62.365 v2(51.664,62.382)
  Bottom Layer w0.381: v2(51.664,62.382) v2(66.802,62.382)
ERASE_BUT: C18.1 R20.2 SW3.1 U4.8 | length 41.3
  Top Layer w0.381: v2@63.628,56.007 U4.8@65.202,56.007 ; v2(72.746,35.077) 72.771,35.103 C18.1@83.083,35.103 ; C18.1@83.083,35.141 R20.2@83.083,36.144 84.721,36.144 SW3.1@84.731,36.154
  Bottom Layer w0.305: v2(63.615,55.994) 67.069,55.994 72.746,50.317 v2(72.746,35.077)
FB_BOOST12V: R14.2 R15.2 U3.5
G_EN: R21.2 U4.14 | length 88.6
  Top Layer w0.305: R21.2@2.337,17.526 v2(4.369,17.526)
  Top Layer w0.381: v2(63.703,46.126) 63.703,48.164 63.926,48.387 U4.14@65.202,48.387
  Bottom Layer w0.305: v2(4.369,17.526) 4.369,30.607 8.458,34.696 27.584,34.696 28.778,35.89 28.778,42.799 30.836,44.856 37.744,44.856 39.014,46.126 v2(63.703,46.126)
GND: C1.2 C2.2 C3.2 C4.1 C5.2 C6.2 C7.2 C8.2 C9.1 C10.2 C11.2 C12.2 C13.2 C14.1 C15.1 C16.2 C17.2 C18.2 C19.2 C20.2 C21.2 C22.2 C48.1 C50.2 C51.2 C52.2 C53.2 C54.1 C59.2 C60.2 C61.2 C62.2 C63.2 C64.2 C65.1 C66.2 C67.2 C68.2 C69.2 C71.1 C73.2 C74.2 C75.2 C76.2 C77.2 C80.1 C81.2 D1.1 D2.2 D3.2 D4.1 J1.1 J2.A1/B12 J2.B1/A12 J2.S1 J2.S2 J2.S3 J2.S4 J3.2 J3.MP1 J3.MP2 LED3.2 P3.1 Q5.2 Q6.2 Q7.2 Q8.2 R11.2 R13.1 R15.1 R46.2 R47.1 R53.1 R55.2 SW1.1 SW1.2 SW2.3 SW2.4 SW3.2 SW4.3 SW4.4 SW5.3 SW5.4 SW6.3 SW6.4 SW7.3 SW7.4 SW8.4 SW8.5 U1.2 U1.9 U1.11 U2.7 U2.11 U2.12 U2.17 U3.1 U4.1 U4.15 U4.38 U4.39 U4.39_10 U4.39_11 U4.39_12 U4.39_13 U4.39_14 U4.39_15 U4.39_16 U4.39_17 U4.39_18 U4.39_19 U4.39_20 U4.39_21 U4.40 U4.41 U4.42 U4.43 U4.44 U4.45 U4.46 U4.47 U6.9 U6.16 U6.20 U6.25 U6.32 U6.33 U7.2 U7.4 U8.2 U10.2 U10.3 | length 236.8
  Top Layer w0.203: Q8.2@2.328,5.582 Q8.2@2.331,5.585 ; v1@4.594,5.585 v1(4.597,5.588) ; 78.619,26 78.759,26.141
  Top Layer w0.254: C51.2@13.969,28.575 14.736,28.575 14.884,28.426 14.884,27.368 15.033,27.219 U6.9@15.669,27.219 16.369,27.219 U6.33@18.119,25.469 ; U6.16@15.669,23.719 16.369,23.719 U6.33@18.119,25.469 ; U6.20@17.869,23.019 U6.33@17.869,24.257 ; 21.514,28.286 21.514,27.584 21.148,27.219 U6.32@20.569,27.219 19.869,27.219 U6.33@18.119,25.469 ; 22.276,22.504 21.463,22.504 21.285,22.682 21.285,23.495 21.061,23.719 U6.25@20.569,23.719 19.869,23.719 U6.33@18.119,25.469
  Top Layer w0.305: U7.4@48.463,14.237 48.482,14.218 49.002,14.218 49.454,13.767 U7.2@49.672,13.767 50.343,13.767 50.876,14.3 52.172,14.3 52.476,13.995 C74.2@52.476,13.233
  Top Layer w0.381: C48.1@4.369,36.144 C48.1@4.559,36.335 ; 64.653,13.471 U2.7@65.822,13.471 67.189,13.471 U2.17@67.514,13.796
  Top Layer w0.508: J3.2@33.109,62.713 33.109,64.809 33.198,64.897 ; R13.1@40.259,54.153 40.333,54.227 43.232,54.227 U3.1@43.306,54.302 ; R15.1@43.523,43.51 R15.1@43.536,43.523 ; U2.17@67.516,13.795 U2.17@67.855,13.455 ; U2.11@67.931,12.071 U2.17@67.931,13.455 ; 68.212,12.052 U2.12@68.389,12.052 ; U2.12@68.478,11.963 U2.12@68.389,12.052 ; U2.12@68.478,12.052 U2.12@68.389,12.052 ; 69.15,11.938 69.926,11.938 C4.1@70.129,11.735 ; 83.083,31.369 C18.2@83.083,34.163
  Top Layer w0.559: Q7.2@2.292,14.494 v1(2.292,15.056) ; Q8.2@2.331,5.585 v1@4.594,5.585 ; v2(11.735,18.771) v2@11.76,18.745 ; v1(35.23,33.68) 35.255,33.655 v1@35.255,33.604 ; R15.1@43.536,43.523 R15.1@43.548,43.51 ; Q5.2@78.816,30.213 78.816,30.582 79.223,30.988 v1(80.442,30.988)
  Top Layer w0.635: 3.061,0.165 3.721,-0.495 SW4.4@3.938,-0.495 ; SW4.4@3.938,-0.89 SW4.4@3.938,-0.495 ; SW5.3@30.531,-0.495 SW4.4@3.938,-0.495 ; 40.538,13.056 C76.2@40.538,9.754 40.538,9.576 40.602,9.512 40.602,8.937 ; 40.91,13.056 U8.2@41.838,13.056 ; SW8.5@43.515,0.099 SW8.5@43.799,0.383 ; U1.11@74.556,6.645 U1.11@74.803,6.893 ; U1.11@75.009,6.772 U1.11@75.581,6.772 ; U1.11@75.479,6.62 U1.11@75.819,6.96 ; SW2.3@80.57,41.096 SW2.4@87.07,41.096 ; C7.2@82.352,24.21 82.352,25.46 82.985,26.093 83.416,26.093 ; 84.712,30.315 SW3.2@84.712,32.072
  Top Layer w0.762: R13.1@40.195,54.153 R13.1@40.259,54.153 ; R13.1@40.259,54.331 R13.1@40.526,54.331 ; C76.2@40.475,9.5 C76.2@40.538,9.512 ; 40.882,5.994 42.545,5.994 43.799,4.741 SW8.5@43.799,0.383 ; 67.458,9.627 69.444,9.627 70.129,10.312 C4.1@70.129,11.735 ; C3.2@69.171,17.526 v2(70.587,17.526)
  Top Layer w0.889: R15.1@43.548,43.51 v1(44.425,43.51)
  Top Layer w1.016: C48.1@4.369,36.144 12.878,36.144 12.929,36.195 ; R47.1@22.936,16.612 v2(22.936,17.17) ; P3.1@24.409,8.712 v1(24.409,9.881) 25.527,10.998 37.086,10.998 37.719,11.631 37.719,12.446 C80.1@37.744,12.471 ; 29.489,42.316 29.591,42.418 ; J3.MP1@30.809,65.238 30.809,55.297 31.801,54.305 34.722,54.305 34.9,54.127 ; U4.15@68.242,47.137 68.242,50.056 69.139,50.952 v2(75.159,50.952)
  Bottom Layer w0.559: U4.39_20@72.002,55.777 U4.39_21@73.402,55.777 ; U4.39_21@73.395,55.769 U4.39_21@73.402,55.777 ; 73.966,55.777 U4.39_21@73.402,55.777
  Bottom Layer w0.635: v1(68.199,14.503) 68.199,14.389 v1@68.288,14.3
  Bottom Layer w0.762: v2(-1.118,15.164) -1.118,16.535 -0.533,17.12 1.846,17.12 2.292,16.673 2.292,14.991 2.739,14.545 10.227,14.545 11.735,16.053 v2(11.735,18.771)
  Bottom Layer w1.016: v1(4.597,5.588) 23.139,5.588 24.409,6.858 v1(24.409,9.881) ; v1(17.82,32.42) 18.795,31.445 v1(23.19,31.445) ; v2(21.539,18.237) v2(22.936,17.17) ; v1@68.288,14.3 69.952,14.3 70.587,14.935 70.587,20.512 71.182,21.107 79.566,21.107 82.182,23.724 ; 73.966,55.777 75.159,54.585 v2(75.159,50.952)
  other v1: 84.43,3.843 86.872,4.843 74.803,5.08 75.819,5.08 86.872,5.843 74.803,5.982 75.819,5.982 86.872,6.843 74.803,6.883 75.819,6.883 86.872,7.843 86.872,8.843 86.872,9.843 86.872,10.843 84.43,12.192 66.827,13.081 67.513,13.081 68.199,13.081 66.827,13.792 67.513,13.792 68.199,13.792 66.827,14.503 67.513,14.503 77.872,21.642 79.372,21.642 80.872,21.642 83.872,21.642 85.372,21.642 77.872,23.142 79.372,23.142 80.872,23.142 83.872,23.142 85.372,23.142 17.272,24.663 18.123,24.663 18.974,24.663 80.872,24.642 83.872,24.642 85.372,24.642 17.272,25.463 18.123,25.463 18.974,25.463 17.272,26.264 18.123,26.264 18.974,26.264 37.135,27.963 38.135,27.963 39.135,27.963 40.135,27.963 40.135,28.963 40.135,29.963 37.135,30.963 38.135,30.963 39.135,30.963 40.135,30.963 52.021,37.728 53.021,37.728 54.021,37.728 55.021,37.728 56.021,37.728 30.429,37.855 31.429,37.855 32.429,37.855 33.429,37.855 34.429,37.855 56.021,38.728 30.429,38.855 56.021,39.728 30.429,39.855 52.021,40.728 53.021,40.728 54.021,40.728 55.021,40.728 56.021,40.728 30.429,40.855 31.429,40.855 32.429,40.855 33.429,40.855 34.429,40.855 51.587,43.129
  other v2: 5.232,19.431 5.105,27.153 5.156,28.448
GREEN: LED4.4 Q7.3 | length 1.6
  Top Layer w0.635: LED4.4@2.692,11.849 2.718,11.874 Q7.3@2.718,13.395
GT_DR: Q2.1 U10.5 | length 5.2
  Top Layer w0.381: Q2.1@47.589,25.086 47.589,23.658 48.387,22.86 48.387,21.742 48.641,21.488 U10.5@49.773,21.488
I2S_DIN: R37.2 U4.9 | length 85.5
  Top Layer w0.381: v2(2.845,39.726) 6.045,39.726 6.274,39.954 R37.2@7.188,39.954 ; v2@63.628,54.737 U4.9@65.202,54.737
  Bottom Layer w0.305: v2(2.845,39.726) 2.845,56.261 4.695,58.111 60.228,58.111 v2(63.615,54.724)
I2S_DOUT: R35.2 U4.11 | length 73.6
  Top Layer w0.381: R35.2@2.108,42.647 1.499,42.647 1.092,43.053 1.092,50.825 2.451,52.184 v2(4.267,52.184) ; v2@63.628,52.197 U4.11@65.202,52.197
  Bottom Layer w0.305: v2(4.267,52.184) v2(63.615,52.184)
I2S_LRCK: R36.2 U4.10 | length 79.4
  Top Layer w0.381: R36.2@2.108,41.377 2.108,40.411 1.778,40.081 0.94,40.081 0.33,40.691 0.33,51.13 2.159,52.959 v2(3.658,52.959) ; v2@63.628,53.467 U4.10@65.202,53.467
  Bottom Layer w0.305: v2(3.658,52.959) 63.12,52.959 v2(63.615,53.454)
I2S_MCLK: R33.2 SB3.2 | length 87.1
  Top Layer w0.305: v2(27.838,47.701) v2(27.838,50.444) ; v2(69.393,49.708) 78.994,49.708 81.299,47.403 SB3.2@84.176,47.403
  Top Layer w0.381: R33.2@3.175,48.247 3.175,49.225 4.394,50.444 v2(6.375,50.444) ; SB3.2@84.176,47.403 84.182,47.409 SB3.2@84.303,47.409
  Bottom Layer w0.305: v2(6.375,50.444) v2(27.838,50.444) ; v2(27.838,47.701) 67.386,47.701 v2(69.393,49.708)
I2S_SCLK: R34.2 U4.12 | length 70.1
  Top Layer w0.381: R34.2@2.083,43.942 2.083,50.317 3.15,51.384 v2(4.877,51.384) ; v2@63.628,50.927 U4.12@65.202,50.927
  Bottom Layer w0.305: v2(4.877,51.384) 62.154,51.384 62.624,50.914 v2(63.615,50.914)
IO0: J3.5 R18.2 SB3.1 SW2.1 SW2.2 U4.25 | length 72.1
  Top Layer w0.508: J3.5@36.109,62.713 36.109,60.309 37.186,59.233 v2(61.9,59.233)
  Top Layer w0.635: SW2.2@80.57,44.147 SW2.1@87.07,44.147 87.07,47.956 86.677,48.349 R18.2@85.484,48.349 R18.2@85.433,48.349 ; v2(81.407,48.387) U4.25@82.702,48.387 ; U4.25@82.74,48.349 SB3.1@84.303,48.349 R18.2@85.433,48.349 ; R18.2@85.496,48.285 R18.2@85.433,48.349
  Bottom Layer w0.381: v2(61.9,59.233) 76.175,59.233 81.407,54 v2(81.407,48.387)
LCK: C27.1 R36.1 U5.7 | length 4.6
  Top Layer w0.203: C27.1@4.724,41.491 5.855,41.491 6.452,42.088 6.452,43.764 6.702,44.014 U5.7@7.313,44.014
LOUTN: C47.1 FB3.1 U6.11 | length 16
  Top Layer w0.254: C47.1@10.668,26.219 U6.11@15.669,26.219
  Top Layer w0.305: 6.998,32.654 7.554,32.654 8.484,31.725 8.484,27.28 9.449,26.314 C47.1@10.668,26.314
  Top Layer w0.381: FB3.1@6.185,33.896 6.185,33.467 FB3.1@6.223,33.429 ; FB3.1@6.223,33.357 FB3.1@6.223,33.429 ; FB3.1@6.223,33.896 FB3.1@6.223,33.429 ; 6.998,32.654 FB3.1@6.223,33.429
LOUTP: C49.1 FB4.1 U6.14 | length 18.2
  Top Layer w0.254: v2(13.564,24.613) 14.376,24.613 14.483,24.719 U6.14@15.669,24.719
  Top Layer w0.305: FB4.1@6.298,30.292 6.896,29.694 6.896,29.667 7.048,29.515 7.569,29.515 7.854,29.23 7.854,28.977 7.849,28.971 7.849,24.501 8.778,23.571 v2(9.728,23.571) 9.741,23.584 10.63,23.584 C49.1@10.643,23.571
  Top Layer w0.381: FB4.1@5.853,30.737 6.298,30.292 6.298,29.585 6.787,29.585 ; C49.1@10.643,23.571 C49.1@10.668,23.597
  Bottom Layer w0.305: v2(9.728,23.571) 9.754,23.546 12.497,23.546 v2(13.564,24.613)
LX: D3.1 L1.1 U2.2 U2.3
MCLK: C25.1 R33.1 U5.1 | length 2.8
  Top Layer w0.203: C25.1@5.778,48.159 6.324,48.159 6.502,47.981 6.502,46.863 6.651,46.714 U5.1@7.313,46.714
MIC_IN_N: C43.1 U5.23 | length 20.6
  Top Layer w0.203: v2(5.105,54.305) 4.932,54.132 4.932,53.808 10.124,48.617 10.124,47.542 10.146,47.52 U5.23@10.146,47.297 ; C43.1@12.294,56.566 12.383,56.566 12.617,56.801 12.959,56.801 v2(13.132,56.628)
  Bottom Layer w0.203: v2(5.105,54.305) 5.105,54.413 4.932,54.586 4.932,55.936 5.798,56.801 12.851,56.801 13.024,56.628 v2(13.132,56.628)
MIC_IN_P: C41.1 U5.24 | length 21.3
  Top Layer w0.203: v2(4.353,54.305) 4.526,54.132 4.526,53.64 9.717,48.449 9.717,47.542 9.696,47.52 U5.24@9.696,47.297 ; C41.1@12.294,57.442 12.383,57.442 12.617,57.207 12.959,57.207 v2(13.132,57.38)
  Bottom Layer w0.203: v2(4.353,54.305) 4.353,54.413 4.526,54.586 4.526,56.104 5.629,57.207 12.851,57.207 13.024,57.38 v2(13.132,57.38)
MIC_N: J4.1 SB4.2 SB5.2 | length 3.6
  Top Layer w0.203: J4.1@13.728,61.433 13.728,60.933 13.43,60.634 13.425,60.634 13.306,60.515 13.306,58.982 13.906,58.382 SB4.2@13.995,58.382
MIC_P: C41.2 C42.2 J4.2 R43.1 | length 3.5
  Top Layer w0.203: C41.2@12.294,58.382 12.383,58.382 12.9,58.899 12.9,60.515 12.781,60.634 12.777,60.634 12.478,60.933 J4.2@12.478,61.433
MUTE: D6.1 P9.1 R46.1 U6.4 | length 34.4
  Top Layer w0.254: U6.4@18.369,27.919 18.369,29.367 18.565,29.564 v2@18.565,30.021
  Top Layer w0.305: v2@18.565,30.021 v2(18.567,30.023) ; 21.655,32.878 21.673,32.859
  Top Layer w0.381: P9.1@19.397,8.712 v2(19.397,10.389)
  Bottom Layer w0.305: v2(18.567,30.023) 18.898,30.353 v2(21.895,30.353) 23.089,30.353 23.901,29.54 23.901,23.393 23.19,22.682 19.025,22.682 17.899,21.556 17.899,11.887 v2(19.397,10.389)
MUTE#: D6.2 U4.23 | length 65.3
  Top Layer w0.381: v2(24.416,32.791) D6.2@24.416,35.128 ; v2(63.246,32.791) 63.246,36.195 70.968,43.917 76.937,43.917 78.402,45.382 U4.23@78.402,47.137
  Bottom Layer w0.381: v2(24.416,32.791) 63.111,32.791 63.187,32.868 v2@63.246,32.868
NetC33_2: C33.2 C34.2 U5.10 | length 2.1
  Top Layer w0.203: U5.10@8.796,43.431 8.796,41.585 8.979,41.402
NetC35_1: C35.1 U5.22 | length 1.8
  Top Layer w0.203: U5.22@10.596,47.297 10.596,48.188 10.77,48.362 C35.1@10.77,49.073
NetC35_2: C35.2 P7.1 | length 8.9
  Top Layer w0.305: C35.2@10.77,50.597 10.77,51.308 11.176,51.714 16.84,51.714 17.323,52.197 P7.1@17.323,53.416
NetC36_1: C36.1 U5.21 | length 3.1
  Top Layer w0.203: U5.21@11.179,46.714 11.802,46.714 11.921,46.833 11.921,46.838 12.04,46.957 C36.1@12.04,49.073
NetC36_2: C36.2 P8.1 | length 9.9
  Top Layer w0.305: C36.2@12.04,50.597 12.878,50.597 13.335,51.054 19.025,51.054 19.753,51.782 P8.1@19.753,53.442
NetC37_2: C37.2 C38.2 R42.2 R43.2 | length 0.1
  Top Layer w0.508: R42.2@8.306,56.769 R42.2@8.357,56.718
NetC43_2: C43.2 C44.2 R45.1 SB4.1
NetC55_1: C55.1 SB6.2
NetC55_2: C55.2 R48.2
NetC56_1: C56.1 SB7.2
NetC56_2: C56.2 R49.2
NetC57_1: C57.1 SB8.2
NetC57_2: C57.2 R50.2
NetC58_1: C58.1 SB9.2
NetC58_2: C58.2 R51.2
NetC63_1: C63.1 U6.21 | length 2.6
  Top Layer w0.254: C63.1@18.369,20.435 U6.21@18.369,23.019
NetC64_1: C64.1 U6.19 | length 2.7
  Top Layer w0.254: C64.1@17.12,20.439 17.12,21.844 17.369,22.093 U6.19@17.369,23.019
NetC80_2: C80.2 U8.4 | length 1.5
  Top Layer w0.635: C80.2@37.744,13.995 37.75,14.001 39.233,14.001 U8.4@39.238,14.006
NetFB1_2: FB1.2 SB2.2
NetLED1_1: LED1.1 LED2.1 R3.1 | length 2.7
  Top Layer w0.305: LED2.1@80.008,-0.956 LED2.1@80.094,-1.041
  Top Layer w0.381: LED2.1@80.008,-0.956 LED1.1@80.008,0.492 ; LED2.1@80.094,-1.041 R3.1@81.178,-1.041
NetLED3_1: LED3.1 R22.1
NetLED4_1: LED4.1 R30.1 | length 1.9
  Top Layer w0.635: LED4.1@-0.508,7.049 -0.495,7.036 -0.495,5.169 R30.1@-0.483,5.156
NetLED4_3: LED4.3 R31.1 | length 1.8
  Top Layer w0.635: LED4.3@2.692,7.049 2.698,7.055 4.515,7.055 R31.1@4.521,7.061
NetLED4_5: LED4.5 R32.1 | length 1.6
  Top Layer w0.635: R32.1@1.067,13.437 1.079,13.424 1.079,11.862 LED4.5@1.092,11.849
NetQ4_1: Q4.1 Q5.3 R12.1 | length 1.4
  Top Layer w0.508: Q4.1@75.133,29.693 75.171,29.731 76.441,29.731 76.479,29.769 R12.1@76.495,29.753
NetQ5_1: Q5.1 R16.1
NetQ6_1: Q6.1 R19.1
NetQ7_1: Q7.1 R21.1
NetQ8_1: Q8.1 R23.1
NetR35_1: R35.1 U5.6 | length 5.1
  Top Layer w0.203: R35.1@3.632,42.659 5.804,42.659 6.096,42.951 6.096,44.018 6.542,44.464 U5.6@7.313,44.464
NetR37_1: R37.1 U5.8 | length 2
  Top Layer w0.203: R37.1@7.112,41.783 7.112,42.113 7.671,42.672 7.896,42.897 U5.8@7.896,43.431
NetR38_2: R38.2 U5.15 | length 7
  Top Layer w0.203: U5.15@11.179,44.014 12.082,44.014 12.268,43.828 v2(12.268,43.307)
  Top Layer w0.305: R38.2@14.605,41.478 v2(15.392,41.478)
  Bottom Layer w0.305: v2(12.268,43.307) 12.268,42.164 12.954,41.478 v2(15.392,41.478)
NetR39_2: R39.2 U5.14 | length 3.8
  Top Layer w0.203: U5.14@10.596,43.431 10.596,43.015 10.685,42.926 11.824,42.926 13.271,41.478 R39.2@13.335,41.478
NetR40_2: R40.2 U5.12 | length 4
  Top Layer w0.203: U5.12@9.696,43.431 9.696,42.689 9.815,42.57 11.659,42.57 12.065,42.164 R40.2@12.065,41.478
NetR41_2: R41.2 U5.11 | length 3.3
  Top Layer w0.203: U5.11@9.246,43.431 9.246,42.418 9.449,42.215 10.651,42.215 10.77,42.096 R41.2@10.77,41.478
NetR48_1: R48.1 U6.2 | length 3.4
  Top Layer w0.254: U6.2@19.369,27.919 U6.2@19.369,27.919 19.37,28.768 20.436,29.834 R48.1@20.436,30.871
NetR49_1: R49.1 U6.3 | length 3.1
  Top Layer w0.254: U6.3@18.869,27.919 18.869,28.928 19.166,29.224 R49.1@19.166,30.871
NetR50_1: R50.1 U6.6 | length 3.3
  Top Layer w0.254: R50.1@16.524,30.871 16.524,29.62 17.369,28.775 U6.6@17.369,27.919
NetR51_1: R51.1 U6.7 | length 3.6
  Top Layer w0.254: R51.1@15.229,30.871 15.229,30.204 16.869,28.564 U6.7@16.869,27.919
NetR53_2: R53.2 SB10.2
PA_EN: D7.2 U4.26 | length 81.7
  Top Layer w0.381: D7.2@24.112,14.859 24.112,16.187 27.652,19.727 v2(37.829,19.727) ; v2(80.366,49.632) 80.378,49.644 U4.26@82.664,49.644
  Bottom Layer w0.305: v2(37.829,19.727) 64.101,19.727 80.366,35.992 v2(80.366,49.632)
PG: Q1.1 R8.1 U1.10
PL: C73.1 P10.1 SB10.1 U6.18 | length 16.5
  Top Layer w0.254: C73.1@15.824,20.396 15.824,21.412 v2(16.347,21.935) 16.869,22.457 U6.18@16.869,23.019
  Top Layer w0.381: P10.1@16.878,8.42 P10.1@16.891,8.407 ; P10.1@16.878,8.725 v2(16.878,10.401)
  Bottom Layer w0.305: v2(16.347,21.935) 16.347,10.933 v2(16.878,10.401)